# Altium PCB PCB1.PcbDoc
Units mm, origin at the board's own origin, x right, y up, seen from the top; angles counter-clockwise.
Board outline 120 x 80 mm, 2 copper layers (Top Layer, Bottom Layer); 110 components, 84 nets, 483 pads, 41 vias.
Unrouted connection lines stored in the file: 201.
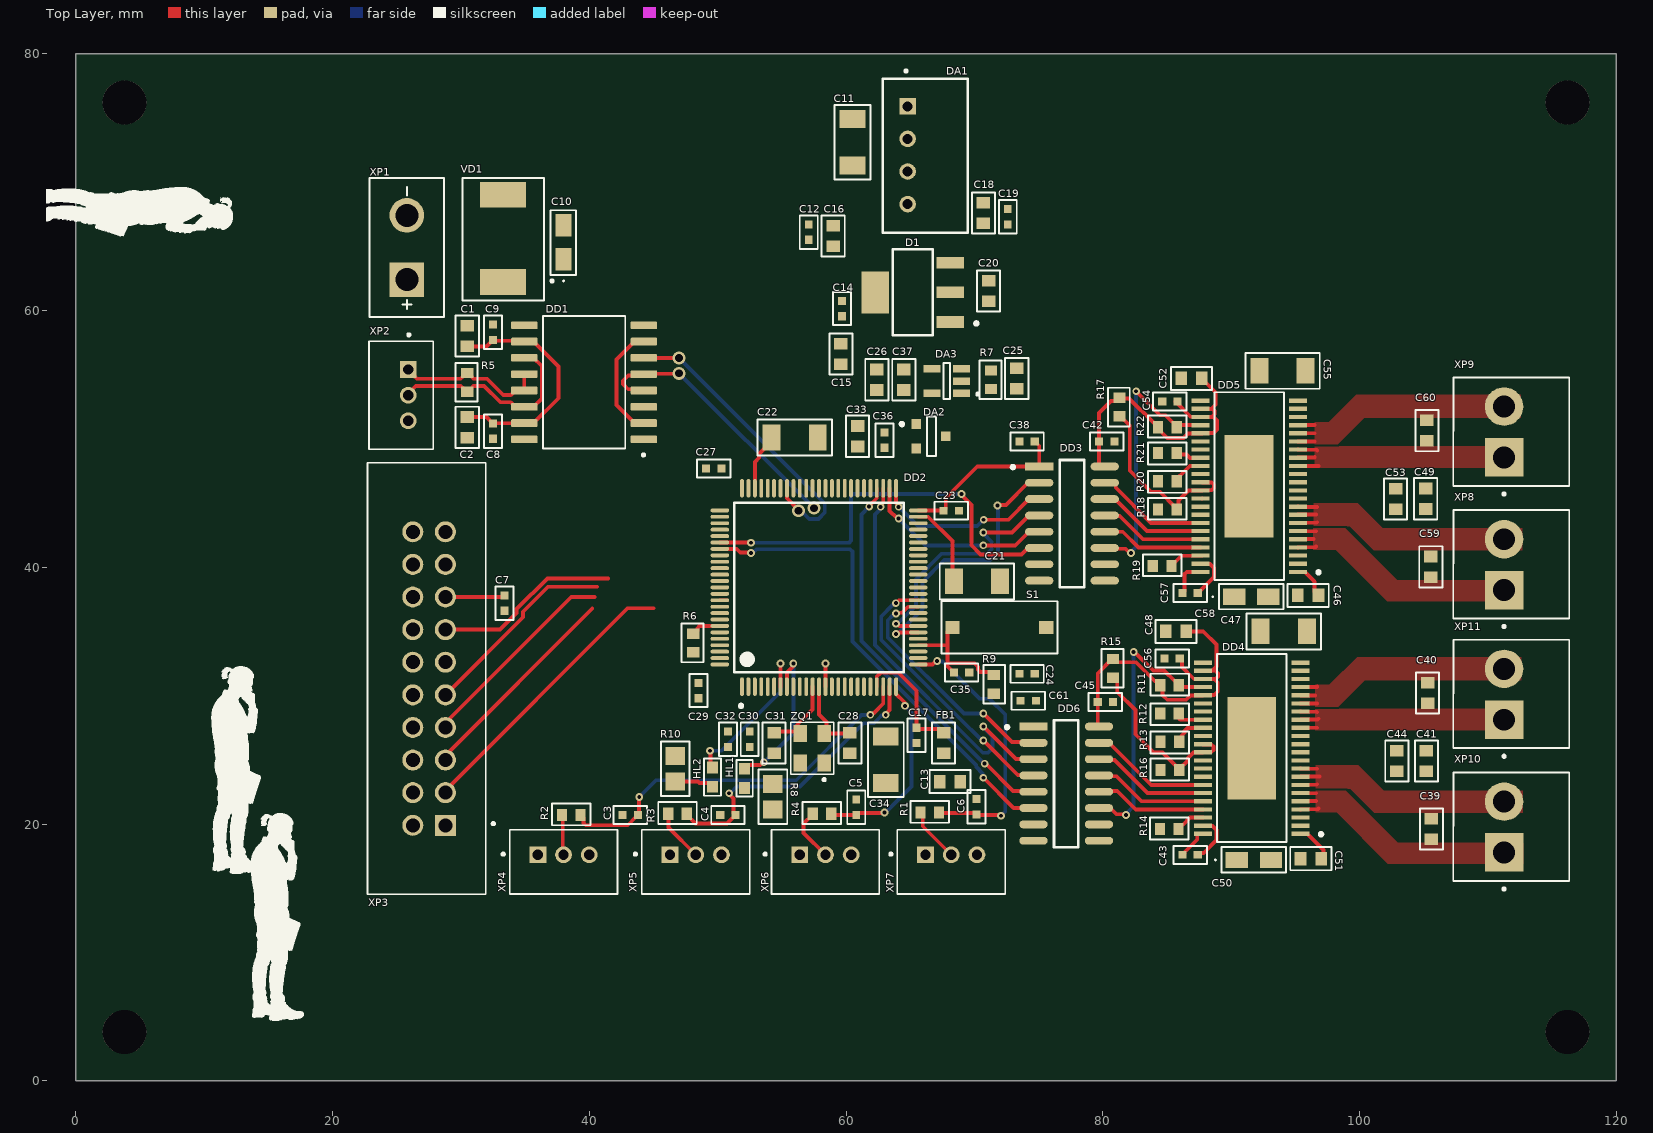
[diagram p0: Top Layer view]
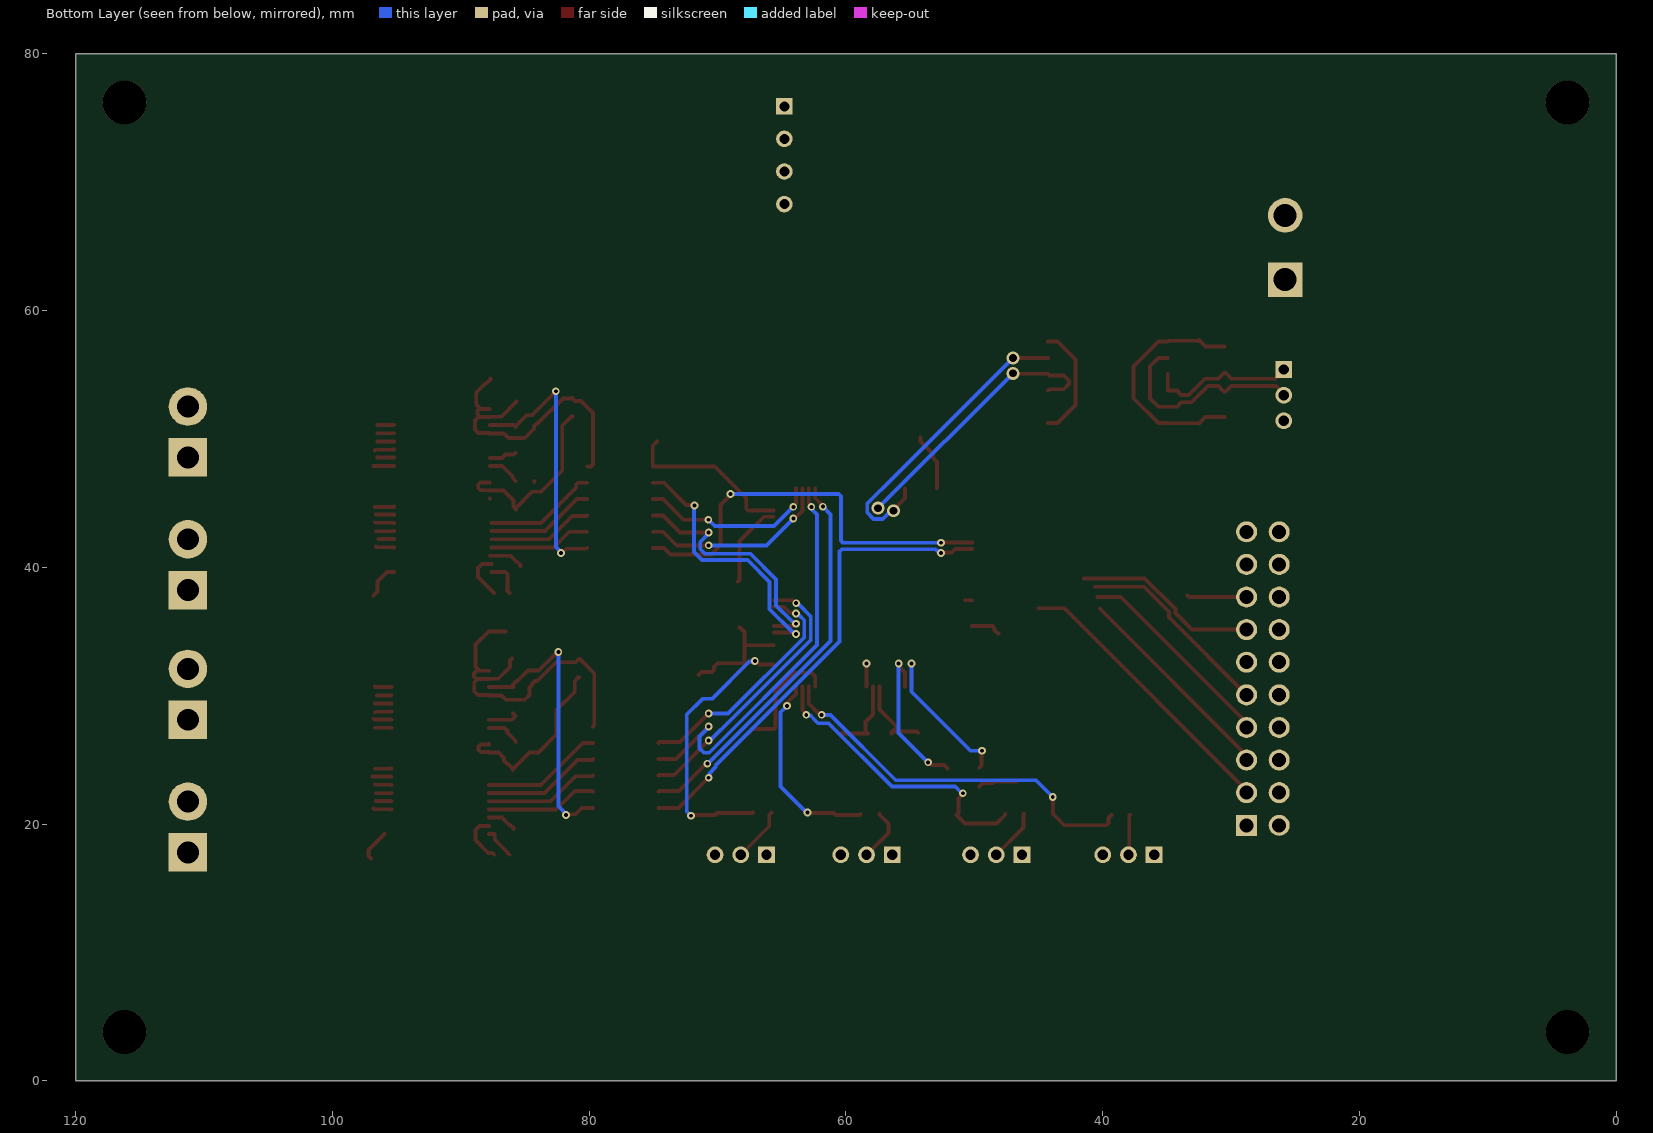
[diagram p1: Bottom Layer view, seen from below]
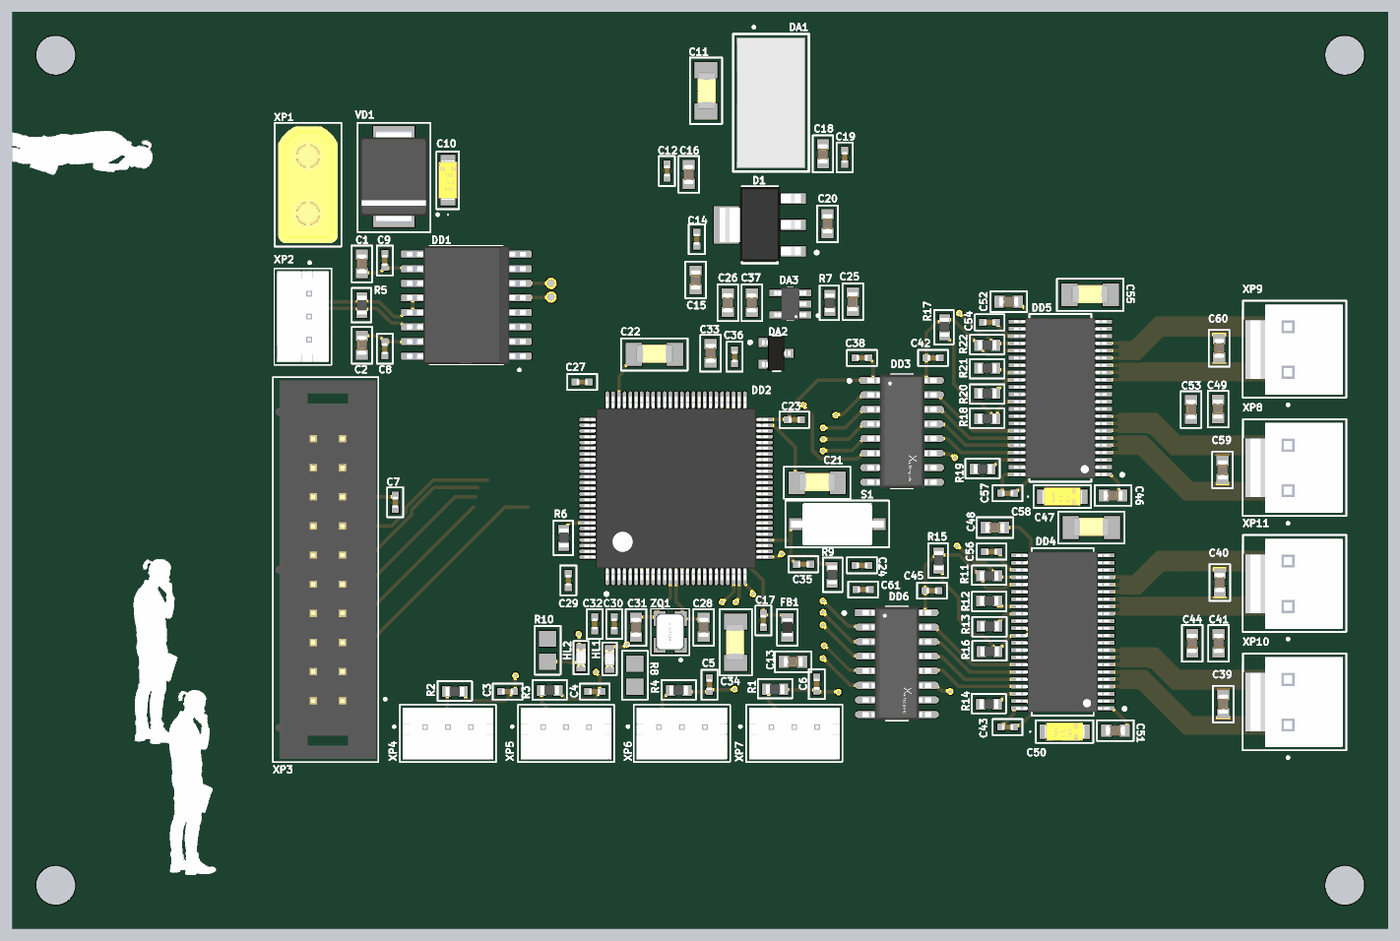
[diagram p2: 3D render of the assembled board from above, using the file's embedded part models]

## Layer stack, top to bottom
Top Solder: solder mask 0.0102, Solder Resist, Dk 3.5
Top Layer: signal copper 0.0356
Dielectric 1: dielectric 0.32, FR-4, Dk 4.8
Bottom Layer: signal copper 0.0356
Bottom Solder: solder mask 0.0102, Solder Resist, Dk 3.5

## Board outline
0,0 0,80 120,80 120,0

## Design rules (kind name [scope] priority, off if disabled: settings)
Clearance [All] p1: gap=0.2 ignorepadtopadclearanceinfootprint=FALSE
DiffPairsRouting [All] p1: maxlimit=0.254 minlimit=0.25 mostfreqgap=0.254 toplayer_minwidth=0.25 toplayer_maxwidth=0.4 toplayer_prefwidth=0.381 bottomlayer_minwidth=0.25 bottomlayer_maxwidth=0.4 bottomlayer_prefwidth=0.381 maxuncoupledlength=12.7
HoleSize [All] p1: absolutevalues=TRUE maxlimit=5 minlimit=0.5 maxpercent=80.000 minpercent=20.000
PolygonConnect PolygonConnect_1 [(InNet('M1_OUT_+') OR InNet('M1_OUT_-') OR InNet('M2_OUT_+') OR InNet('M2_OUT_-') OR InNet('M3_OUT_+') OR InNet('M3_OUT_-') OR InNet('M4_OUT_+') OR InNet('M4_OUT_-'))] p1: connectstyle=Direct reliefconductorwidth=0.254 reliefentries=4 polygonreliefangle="90 Angle" airgapwidth=0.254
PolygonConnect [All] p2: thpad.connectstyle=Relief thpad.reliefconductorwidth=0.254 thpad.reliefentries=4 thpad.polygonreliefangle="90 Angle" thpad.airgapwidth=0.254 smdpad.connectstyle=Relief smdpad.reliefconductorwidth=0.254 smdpad.reliefentries=4 smdpad.polygonreliefangle="90 Angle" smdpad.airgapwidth=0.254 via.connectstyle=Direct via.reliefconductorwidth=0.254 via.reliefentries=4 via.polygonreliefangle="90 Angle" via.airgapwidth=0.254
RoutingVias [All] p1: holewidth=0.6 width=1 viastyle="Through Hole" minholewidth=0.6 minwidth=1 maxholewidth=0.6 maxwidth=1
SolderMaskExpansion [All] p1: expansion=0.102 istentingtop=FALSE
SupplyNets "Schematic Supply Nets_9" [InNet('DVDD1')] p1: voltage=0.000
SupplyNets "Schematic Supply Nets_8" [InNet('GND_PWR')] p2: voltage=0.000
SupplyNets "Schematic Supply Nets_7" [InNet('VDDA')] p3: voltage=0.000
SupplyNets "Schematic Supply Nets_6" [InNet('+5В')] p4: voltage=0.000
SupplyNets "Schematic Supply Nets_5" [InNet('GND_MCU')] p5: voltage=0.000
SupplyNets "Schematic Supply Nets_4" [InNet('+24В')] p6: voltage=0.000
SupplyNets "Schematic Supply Nets_3" [InNet('VDD')] p7: voltage=0.000
SupplyNets "Schematic Supply Nets_2" [InNet('VREF+')] p8: voltage=0.000
SupplyNets "Schematic Supply Nets_1" [InNet('GND_ISO')] p9: voltage=0.000
SupplyNets "Schematic Supply Nets" [InNet('DVDD2')] p10: voltage=0.000
Width [All] p1: maxlimit=3 minlimit=0.2 preferedwidth=0.3
28 further rules are at their usual default settings.

## Classes and differential pairs
component class Sheet1: C1 C2 C3 C4 C5 C6 C7 C8 C9 C11 C12 C13 C14 C15 C16 C17 C18 C19 C20 C21 C22 C23 C24 C25 C26 C27 C28 C29 C30 C31 C32 C33 C34 C35 C36 C37 C58 D1 DA1 DA2 DA3 DD1 DD2 FB1 HL1 HL2 R1 R2 R3 R4 R5 R6 R7 R8 R9 R10 S1 VD1 XP1 XP2 XP3 XP4 XP5 XP6 XP7 ZQ1
component class Drivers: C10 C38 C39 C40 C41 C42 C43 C44 C45 C46 C47 C48 C49 C50 C51 C52 C53 C54 C55 C56 C57 C59 C60 C61 DD3 DD4 DD5 DD6 R11 R12 R13 R14 R15 R16 R17 R18 R19 R20 R21 R22 XP8 XP9 XP10 XP11
differential pair RS: +RS_P -RS_N

## Components (designator, comment, footprint, x,y, rotation, side; value= is the part's Value field where it differs from the comment)
C1 "Capacitor" 0603C 30.5,58 r270 top value="10 мк"
C2 "Capacitor" 0603C 30.5,50.9 r90 top value="10 н"
C3 "Capacitor" 0402C 43.2,20.7 r0 top value="0,1 мк"
C4 "Capacitor" 0402C 50.803,20.7 r0 top value="0,1 мк"
C5 "Capacitor" 0402C 60.8,21.3 r270 top value="0,1 мк"
C6 "Capacitor" 0402C 70.155,21.342 r270 top value="0,1 мк"
C7 "Capacitor" 0402C 33.4,37.203 r90 top value="0,1 мк"
C8 "Capacitor" 0402C 32.5,50.597 r90 top value="0,1 мк"
C9 "Capacitor" 0402C 32.5,58.3 r270 top value="0,1 мк"
C10 "Capacitor" TC_A 38,65.3 r90 top value="22 мк"
C11 "Capacitor" 1206C 60.5,73.1 r270 top value="4,7 мк"
C12 "Capacitor" 0402C 57.1,66.097 r90 top value="0,1 мк"
C13 "Capacitor" 0603C 68.1,23.3 r180 top value="1 мк"
C14 "Capacitor" 0402C 59.7,60.149 r90 top value="0,1 мк"
C15 "Capacitor" 0603C 59.6,56.6 r90 top value="10 н"
C16 "Capacitor" 0603C 59,65.8 r270 top value="10 мк"
C17 "Capacitor" 0402C 65.5,26.903 r90 top value="0,1 мк"
C18 "Capacitor" 0603C 70.7,67.6 r90 top value="10 мк"
C19 "Capacitor" 0402C 72.6,67.297 r90 top value="0,1 мк"
C20 "Capacitor" 0603C 71.1,61.5 r90 top value="10 мк"
C21 "Capacitor" 1206C 70.2,38.9 r0 top value="2,2 мк"
C22 "Capacitor" 1206C 56,50.1 r0 top value="2,2 мк"
C23 "Capacitor" 0402C 68.203,44.4 r180 top value="0,1 мк"
C24 "Capacitor" 0402C 74.1,31.7 r180 top value="0,1 мк"
C25 "Capacitor" 0603C 73.3,54.7 r270 top value="1 мк"
C26 "Capacitor" 0603C 62.4,54.6 r270 top value="0,47 мк"
C27 "Capacitor" 0402C 49.703,47.7 r0 top value="0,1 мк"
C28 "Capacitor" 0603C 60.3,26.303 r90 top value="12 п"
C29 "Capacitor" 0402C 48.5,30.397 r90 top value="0,1 мк"
C30 "Capacitor" 0402C 52.5,26.603 r90 top value="0,1 мк"
C31 "Capacitor" 0603C 54.4,26.303 r90 top value="12 п"
C32 "Capacitor" 0402C 50.8,26.603 r90 top value="0,1 мк"
C33 "Capacitor" 0603C 60.9,50.2 r270 top value="1 мк"
C34 "Capacitor" 1206C 63.1,25.003 r90 top value="4,7 мк"
C35 "Capacitor" 0402C 69.003,31.8 r180 top value="0,1 мк"
C36 "Capacitor" 0402C 63,49.9 r270 top value="0,1 мк"
C37 "Capacitor" 0603C 64.5,54.6 r270 top value="1 мк"
C38 "Capacitor" 0402C 74.1,49.8 r0 top value="0,1 мк"
C39 "Capacitor" 0603C 105.6,19.6 r270 top value="2,2 н"
C40 "Capacitor" 0603C 105.3,30.2 r90 top value="2,2 н"
C41 "Capacitor" 0603C 105.2,24.9 r270 top value="10 н"
C42 "Capacitor" 0402C 80.303,49.8 r180 top value="0,1 мк"
C43 "Capacitor" 0402C 86.8,17.6 r180 top value="0,1 мк"
C44 "Capacitor" 0603C 102.9,24.9 r270 top value="10 н"
C45 "Capacitor" 0402C 80.2,29.5 r180 top value="0,1 мк"
C46 "Capacitor" 0603C 96,37.8 r180 top value="1 мк"
C47 "Capacitor" 1206C 94.1,35 r0 top value="4,7 мк"
C48 "Capacitor" 0603C 85.7,35 r0 top value="1 мк"
C49 "Capacitor" 0603C 105.149,45.332 r270 top value="10 н"
C50 "Capacitor" TC_A 91.775,17.2 r0 top value="22 мк"
C51 "Capacitor" 0603C 96.2,17.3 r180 top value="1 мк"
C52 "Capacitor" 0603C 86.9,54.7 r0 top value="1 мк"
C53 "Capacitor" 0603C 102.8,45.3 r270 top value="10 н"
C54 "Capacitor" 0402C 85.225,52.9 r0 top value="0,1 мк"
C55 "Capacitor" 1206C 94,55.3 r0 top value="4,7 мк"
C56 "Capacitor" 0402C 85.4,32.9 r0 top value="0,1 мк"
C57 "Capacitor" 0402C 86.803,38 r180 top value="0,1 мк"
C58 "Capacitor" TC_A 91.575,37.7 r0 top value="22 мк"
C59 "Capacitor" 0603C 105.549,40.032 r270 top value="2,2 н"
C60 "Capacitor" 0603C 105.249,50.632 r90 top value="2,2 н"
C61 "Capacitor" 0402C 74.2,29.6 r0 top value="0,1 мк"
D1 "LD1117S33CTR" SOT223 65.2,61.4 r180 top
DA1 "TME 2405S" CONV_TME_2405S 66.675,72.05 r270 top
DA2 "REF3030AIDBZR" SOT23-3 66.6,50.2 r0 top
DA3 "ADP150AUJZ-3.3" SOT23-5 67.855,54.5 r180 top
DD1 "ADM2682EBRIZ" SOIC-16W 39.6,54.4 r180 top
DD2 "STM32F407VGT6" LQFP100 57.9,38.425 r90 top
DD3 "ISO7762DWR" SOIC-16 77.6,43.4 r0 top
DD4 "DRV8262DDWR" HTSSOP44-DDW_TEX 91.6,25.9 r180 top
DD5 "DRV8262DDWR" HTSSOP44-DDW_TEX 91.4,46.303 r180 top
DD6 "ISO7762DWR" SOIC-16 77.149,23.145 r0 top
FB1 "BLM18AG102SN1D" 0603L 67.6,26.3 r90 top
HL1 "LED 0603 RED" 0603D_red 52.1,23.55 r90 top value=Красный
HL2 "LED 0603 GREEN" 0603D_green 49.6,23.65 r90 top value=Зелёный
R1 "Resistor" 0603R 66.525,20.9 r0 top value="10 к"
R2 "Resistor" 0603R 38.6,20.7 r0 top value="10 к"
R3 "Resistor" 0603R 46.875,20.8 r0 top value="10 к"
R4 "Resistor" 0603R 58.125,20.8 r0 top value="10 к"
R5 "Resistor" 0603R 30.5,54.4 r90 top value=120
R6 "Resistor" 0603R 48.1,34.1 r90 top value="10 к"
R7 "Resistor" 0603R 71.3,54.6 r90 top value="10 к"
R8 "Resistor" 0805R 54.3,22.125 r90 top value="1 к"
R9 "Resistor" 0603R 71.5,30.875 r270 top value="10 к"
R10 "Resistor" 0805R 46.7,24.3 r270 top value="1 к"
R11 "Resistor" 0603R 85.2,30.8 r0 top value="10 к"
R12 "Resistor" 0603R 85.2,28.6 r180 top value="4,7 к"
R13 "Resistor" 0603R 85.225,26.4 r180 top value="3,6 к"
R14 "Resistor" 0603R 85.175,19.6 r0 top value="100 к"
R15 "Resistor" 0603R 80.8,32.125 r90 top value="10 к"
R16 "Resistor" 0603R 85.225,24.2 r0 top value="15 к"
R17 "Resistor" 0603R 81.3,52.475 r90 top value="10 к"
R18 "Resistor" 0603R 85.025,44.5 r0 top value="15 к"
R19 "Resistor" 0603R 84.625,40.1 r0 top value="100 к"
R20 "Resistor" 0603R 85.025,46.7 r180 top value="3,6 к"
R21 "Resistor" 0603R 85.025,48.9 r180 top value="3,6 к"
R22 "Resistor" 0603R 85.025,50.9 r0 top value="10 к"
S1 "TSS-TD-19XA-XTR" TSS-TD-19XA-XTR 71.95,35.3 r0 top
VD1 "SM15T33A" SMC 33.3,65.6 r90 top value="30 В"
XP1 "XT30UPB-M" XT30UPB-M 25.8,64.9 r90 top
XP2 "JST PH-3" JST_B3B-PH-K-S(LF)(SN) 25.35,53.4 r90 top
XP3 "ARM JTAG 20" 3M_30320-6002HB 27.53,31.33 r90 top
XP4 "JST PH-3" JST_B3B-PH-K-S(LF)(SN) 38,17.05 r180 top
XP5 "JST PH-3" JST_B3B-PH-K-S(LF)(SN) 48.3,17.05 r180 top
XP6 "JST PH-3" JST_B3B-PH-K-S(LF)(SN) 58.4,17.05 r180 top
XP7 "JST PH-3" JST_B3B-PH-K-S(LF)(SN) 68.2,17.05 r180 top
XP8 "JST VH-2" B2P-VH 111.251,40.2 r90 top
XP9 "JST VH-2" B2P-VH 111.251,50.532 r90 top
XP10 "JST VH-2" B2P-VH 111.251,19.768 r90 top
XP11 "JST VH-2" B2P-VH 111.251,30.1 r90 top
ZQ1 "XTAL_GND" QSMD3.2x2.5 58.3,24.753 r180 top value="8 МГц"

## Footprints (in the part's own frame and the unit in brackets; to place one, negate y for a bottom-side part, rotate by r counter-clockwise, add the part's x,y. Pads: shape width x height; smd on the part's side, far side on the other; paste and mask are expansions set on the pad)
3M_30320-6002HB [mil]
  rect 64.5x64.5 / inner round 64.5 / far side rect 64.5x64.5 hole 43: 1(-450,-50)
  round 64.5 hole 43: 2(-450,50) 3(-350,-50) 4(-350,50) 5(-250,-50) 6(-250,50) 7(-150,-50) 8(-150,50) 9(-50,-50) 10(-50,50) 11(50,-50) 12(50,50) 13(150,-50) 14(150,50) 15(250,-50) 16(250,50) 17(350,-50) 18(350,50) 19(450,-50) 20(450,50)
  silkscreen extent -661,-201 661,189, body extent -650,-165 650,180, height 360
0402C [mm]
  rect 0.635x0.61 smd: 1(-0.597,0) 2(0.597,0)
  silkscreen extent -1.3,-0.7 1.3,0.7, body extent -0.51,-0.25 0.51,0.25, height 0.71
0603C [mm] "Chip Resistor, 2-Leads, Body 1,40x0,80mm, IPC Medium Density"
  rect 0.9x1.05 smd: 1(-0.8,0) 2(0.8,0)
  silkscreen extent -1.6,-0.9 1.6,0.9, body extent -0.85,-0.45 0.85,0.45, height 0.9
0603D_green [mm]
  rect 0.91x0.83 smd: 1(0.75,0) 2(-0.75,0)
  silkscreen extent -1.45,-0.66 1.45,0.66, body extent -0.8,-0.41 0.8,0.41, height 0.71
0603D_red [mm]
  rect 0.91x0.83 smd: 1(0.75,0) 2(-0.75,0)
  silkscreen extent -1.42,-0.64 1.42,0.64, body extent -0.8,-0.41 0.8,0.41, height 0.71
0603L [mm] "Chip Inductor, 2-Leads, Body 1,55x0,85mm, IPC Medium Density"
  rect 0.9x1.05 smd: 1(-0.8,0) 2(0.8,0)
  silkscreen extent -1.6,-0.9 1.6,0.9, body extent -0.8,-0.45 0.8,0.45, height 0.45
0603R [mm] "Chip Resistor, 2-Leads, Body 1.60x0.85mm, IPC Medium Density"
  rect 0.8x0.95 smd: 1(-0.725,0) 2(0.725,0)
  silkscreen extent -1.5,-0.8 1.5,0.9, body extent -0.8,-0.4 0.8,0.4, height 0.45
0805R [mm]
  rect 1.4x1.5 smd: 1(-1,0) 2(1,0)
  silkscreen extent -2.12,-1.12 2.12,1.12, body extent -1,-0.63 1,0.63, height 0.6
1206C [mm]
  rect 1.4x2 smd paste+0: 1(-1.8,0) 2(1.8,0)
  silkscreen extent -2.9,-1.4 2.9,1.4, body extent -1.6,-0.74 1.6,0.86, height 1.59
B2P-VH [mm]
  rect 3x3 / inner round 3 / far side rect 3x3 hole 1.7 mask+0.102: 1(-1.98,0)
  round 3 hole 1.7 mask+0.102: 2(1.98,0)
  silkscreen extent -4.93,-5.08 4.25,3.96, body extent -3.93,-4.8 3.93,3.7, height 10.9
CONV_TME_2405S [mm]
  rect 1.288x1.288 hole 0.78: 1(-3.85,-1.875)
  round 1.288 hole 0.78: 2(-1.31,-1.875) 3(1.23,-1.875) 4(3.77,-1.875)
  silkscreen extent -6.7,-3.8 6,2.8, body extent -5.7,-3.5 5.7,2.5, height 9.91
HTSSOP44-DDW_TEX [mil]
  rect 55.28x12.97 smd: 1(-149.64,262.5) 2(-149.64,237.5) 3(-149.64,212.5) 4(-149.64,187.5) 5(-149.64,162.5) 6(-149.64,137.5) 7(-149.64,112.5) 8(-149.64,87.5) 9(-149.64,62.5) 10(-149.64,37.5) 11(-149.64,12.5) 12(-149.64,-12.5) 13(-149.64,-37.5) 14(-149.64,-62.5) 15(-149.64,-87.5) 16(-149.64,-112.5) 17(-149.64,-137.5) 18(-149.64,-162.5) 19(-149.64,-187.5) 20(-149.64,-212.5) 21(-149.64,-237.5) 22(-149.64,-262.5) 23(149.64,-262.5) 24(149.64,-237.5) 25(149.64,-212.5) 26(149.64,-187.5) 27(149.64,-162.5) 28(149.64,-137.5) 29(149.64,-112.5) 30(149.64,-87.5) 31(149.64,-62.5) 32(149.64,-37.5) 33(149.64,-12.5) 34(149.64,12.5) 35(149.64,37.5) 36(149.64,62.5) 37(149.64,87.5) 38(149.64,112.5) 39(149.64,137.5) 40(149.64,162.5) 41(149.64,187.5) 42(149.64,212.5) 43(149.64,237.5) 44(149.64,262.5)
  rect 150x315 smd paste-196.85: 45(0,0)
  silkscreen extent -218,-288 106,287, body extent -159,-276 159,276, height 47
JST_B3B-PH-K-S(LF)(SN) [mm]
  rect 1.308x1.308 / inner round 1.308 / far side rect 1.308x1.308 hole 0.8: 1(2,-0.55)
  round 1.308 hole 0.8: 2(0,-0.55) 3(-2,-0.55)
  silkscreen extent -4.2,-2.5 4.8,2.5, body extent -3.95,-2.25 3.95,2.25, height 6
LQFP100 [mm] "TSQFP, 100-Leads, Body 14,00x14,00mm, Pitch 0,50mm, IPC Medium Density"
  oval 1.45x0.3 smd: 1(-7.725,6) 2(-7.725,5.5) 3(-7.725,5) 4(-7.725,4.5) 5(-7.725,4) 6(-7.725,3.5) 7(-7.725,3) 8(-7.725,2.5) 9(-7.725,2) 10(-7.725,1.5) 11(-7.725,1) 12(-7.725,0.5) 13(-7.725,0) 14(-7.725,-0.5) 15(-7.725,-1) 16(-7.725,-1.5) 17(-7.725,-2) 18(-7.725,-2.5) 19(-7.725,-3) 20(-7.725,-3.5) 21(-7.725,-4) 22(-7.725,-4.5) 23(-7.725,-5) 24(-7.725,-5.5) 25(-7.725,-6) 51(7.725,-6) 52(7.725,-5.5) 53(7.725,-5) 54(7.725,-4.5) 55(7.725,-4) 56(7.725,-3.5) 57(7.725,-3) 58(7.725,-2.5) 59(7.725,-2) 60(7.725,-1.5) 61(7.725,-1) 62(7.725,-0.5) 63(7.725,0) 64(7.725,0.5) 65(7.725,1) 66(7.725,1.5) 67(7.725,2) 68(7.725,2.5) 69(7.725,3) 70(7.725,3.5) 71(7.725,4) 72(7.725,4.5) 73(7.725,5) 74(7.725,5.5) 75(7.725,6)
  oval 0.3x1.45 smd: 26(-6,-7.725) 27(-5.5,-7.725) 28(-5,-7.725) 29(-4.5,-7.725) 30(-4,-7.725) 31(-3.5,-7.725) 32(-3,-7.725) 33(-2.5,-7.725) 34(-2,-7.725) 35(-1.5,-7.725) 36(-1,-7.725) 37(-0.5,-7.725) 38(0,-7.725) 39(0.5,-7.725) 40(1,-7.725) 41(1.5,-7.725) 42(2,-7.725) 43(2.5,-7.725) 44(3,-7.725) 45(3.5,-7.725) 46(4,-7.725) 47(4.5,-7.725) 48(5,-7.725) 49(5.5,-7.725) 50(6,-7.725) 76(6,7.725) 77(5.5,7.725) 78(5,7.725) 79(4.5,7.725) 80(4,7.725) 81(3.5,7.725) 82(3,7.725) 83(2.5,7.725) 84(2,7.725) 85(1.5,7.725) 86(1,7.725) 87(0.5,7.725) 88(0,7.725) 89(-0.5,7.725) 90(-1,7.725) 91(-1.5,7.725) 92(-2,7.725) 93(-2.5,7.725) 94(-3,7.725) 95(-3.5,7.725) 96(-4,7.725) 97(-4.5,7.725) 98(-5,7.725) 99(-5.5,7.725) 100(-6,7.725)
  silkscreen extent -9.35,-6.6 6.6,6.6, body extent -8,-8 8,8, height 1.6
QSMD3.2x2.5 [mm] "Кварцевый резонатор"
  rect 1.05x1.3 smd: 1(0,0) 2(1.85,-2.3) 3(0,-2.3) 3(1.85,0)
  silkscreen extent -0.76,-3.17 2.6,1.4, body extent -0.32,-2.75 2.18,0.45, height 0.8
SMC [mm]
  rect 2x3.6 smd: 1(3.415,0.021) 2(-3.385,0.021)
  silkscreen extent -4.83,-3.91 4.7,3.18, body extent -3.96,-2.93 3.99,2.97, height 2.65
SOIC-16 [mm] "SOT109-1"
  rect 2.204x0.608 smd: 1(-2.551,4.445)
  rrect100% 2.204x0.608 smd: 2(-2.551,3.175) 3(-2.551,1.905) 4(-2.551,0.635) 5(-2.551,-0.635) 6(-2.551,-1.905) 7(-2.551,-3.175) 8(-2.551,-4.445) 9(2.551,-4.445) 10(2.551,-3.175) 11(2.551,-1.905) 12(2.551,-0.635) 13(2.551,0.635) 14(2.551,1.905) 15(2.551,3.175) 16(2.551,4.445)
  silkscreen extent -4.72,-4.95 0.95,4.95, body extent -4.15,-5.45 4.15,5.45, height 0.25
SOIC-16W [mm]
  rrect25% 2.05x0.6 smd: 1(-4.655,4.445) 2(-4.655,3.175) 3(-4.655,1.905) 4(-4.655,0.635) 5(-4.655,-0.635) 6(-4.655,-1.905) 7(-4.655,-3.175) 8(-4.655,-4.445) 9(4.655,-4.445) 10(4.655,-3.175) 11(4.655,-1.905) 12(4.655,-0.635) 13(4.655,0.635) 14(4.655,1.905) 15(4.655,3.175) 16(4.655,4.445)
  silkscreen extent -4.72,-5.15 3.2,5.75, body extent -5.16,-5.15 5.16,5.15, height 2.65
SOT23-3 [mil]
  rect 30x30 smd: 1(-44.29,37.4) 2(-44.29,-37.6) 3(45.71,-0.1)
  silkscreen extent -93,-61 16,61, body extent -48,-60 50,59, height 41
SOT23-5 [mm]
  rect 1.32x0.59 smd: 1(-1.145,0.95) 2(-1.145,0) 3(-1.145,-0.95) 4(1.145,-0.95) 5(1.145,0.95)
  silkscreen extent -2.51,-1.4 0.25,1.4, body extent -1.4,-1.45 1.4,1.45, height 1.45
SOT223 [mm] "SOT223, ld1117"
  rect 2.15x0.9 smd: 1(-2.925,2.3) 2(-2.925,0) 3(-2.925,-2.3)
  rect 2.15x3.25 smd: 2(2.925,0)
  silkscreen extent -5.08,-3.35 1.55,3.35, body extent -3.56,-3.3 3.51,3.2, height 1.6
TC_A [mm] "Tantalum capacitor, type A,  1 pin - plus"
  rect 1.75x1.25 smd: 1(-1.325,0) 2(1.325,0)
  silkscreen extent -3.05,-0.97 2.5,1, body extent -1.73,-0.8 1.73,0.8, height 1.64
TSS-TD-19XA-XTR [mm]
  rect 1.1x1 smd: 1(-3.65,0) 2(3.65,0)
  silkscreen extent -4.52,-2.02 4.53,2.05, body extent -4.05,-1.85 4.05,1.85, height 2.55
XT30UPB-M [mm]
  rect 2.7x2.7 hole 1.8: 1(-2.5,0)
  round 2.7 hole 1.8: 2(2.5,0)
  silkscreen extent -5.4,-2.9 5.4,2.9, body extent -5.1,-2.6 5.1,2.6, height 10.7

## Part data
C1 C16 C18 C20: library part Capacitor_10u_10_10V_X7R_0603C, "Конденсатор 0603C ёмкостью 10 мк 10%, 10 В, X7R", Capacity (nF)=10000, Dielectric=X7R, Tolerance=10%, Voltage (V)=10, Datasheet=https://static.chipdip.ru/lib/893/DOC031893419.pdf, Part Number=Capacitor_10u_10_10V_X7R_0603C, Автор=glebmih
C2 C15 C41 C44 C49 C53: library part Capacitor_10n_10_50V_X7R_0603C, "Конденсатор 0603C ёмкостью 10 н 10%, 50 В, X7R", Capacity (nF)=10, Dielectric=X7R, Tolerance=10%, Voltage (V)=50, Part Number=Capacitor_10n_10_50V_X7R_0603C
C3 C4 C5 C6 C7 C8 C9 C12 C14 C17 C19 C23 C24 C27 C29 C30 C32 C35 C36 C38 C42 C43 C45 C54 C56 C57 C61: library part Capacitor_0,1u_10_16V_X7R_0603C, "Конденсатор 0402C ёмкостью 0,1 мк 10%, 16 В, X7R", Capacity (nF)=100, Dielectric=X7R, Tolerance=10%, Voltage (V)=16, Part Number=Capacitor_0,1u_10_16V_X7R_0603C, Автор=rreali
C10 C50 C58: library part Capacitor_22u_10_50V_TC_A, "Танталовый конденсатор", Capacity (uF)=22, Tolerance=0,1, Voltage (V)=50, Part Number=Capacitor_22u_10_50V_TC_A, Type=Tantalum
C11 C34 C47 C55: library part Capacitor_4,7u_10_50V_X7R_1206C, "Конденсатор 1206C ёмкостью 4,7 мк 10%, 50 В, X7R", Capacity (nF)=4700, Dielectric=X7R, Tolerance=10%, Voltage (V)=50, Part Number=Capacitor_4,7u_10_50V_X7R_1206C
C13 C25 C33 C37 C46 C48 C51 C52: library part Capacitor_1u_10_25V_X7R_0603C, "Конденсатор 0603C ёмкостью 1 мк 10%, 25 В, X7R", Capacity (nF)=1000, Dielectric=X7R, Tolerance=10%, Voltage (V)=25, Part Number=Capacitor_1u_10_25V_X7R_0603C
C21 C22: library part Capacitor_2,2u_10_50V_X7R_1206C, "Конденсатор 1206C ёмкостью 2,2 мк 10%, 50 В, X7R", Capacity (nF)=2200, Dielectric=X7R, Tolerance=10%, Voltage (V)=50, Part Number=Capacitor_2,2u_10_50V_X7R_1206C
C26: library part Capacitor_0,47u_10_50V_X7R_0603C, "Конденсатор 0603C ёмкостью 0,47 мк 10%, 50 В, X7R", Capacity (nF)=470, Dielectric=X7R, Tolerance=10%, Voltage (V)=50, Part Number=Capacitor_0,47u_10_50V_X7R_0603C
C28 C31: library part Capacitor_12p_5_50V_NP0_0603C, "Конденсатор 0603C ёмкостью 12 п 5%, 50 В, NP0", Capacity (nF)=0,012, Dielectric=NP0, Tolerance=5%, Voltage (V)=50, Part Number=Capacitor_12p_5_50V_NP0_0603C, Автор=glebmih
C39 C40 C59 C60: library part Capacitor_2,2n_10_50V_X7R_0603C, "Конденсатор 0603C ёмкостью 2,2 н 10%, 50 В, X7R", Capacity (nF)=2,2, Dielectric=X7R, Tolerance=10%, Voltage (V)=50, Part Number=Capacitor_2,2n_10_50V_X7R_0603C
D1: "Линейный стабилизатор напряжения", Part Number=LD1117S33CTR
DA1: "DC/DC преобразователь, 1Вт, вход 21.6-26.4В, выход 5В/ 200мА", Part Number="TME 2405S"
DA2: "Источник опорного напряжения, 3В", Datasheet=https://static.chipdip.ru/lib/248/DOC000248445.pdf, Part Number=REF3030AIDBZR, Автор=glebmih
DA3: "Стабилизатор напряжения 3.3В 150мА", Datasheet=https://static.chipdip.ru/lib/986/DOC003986581.pdf, Part Number=ADP150AUJZ-3.3, Автор=glebmih
DD1: "Изолированный RS-485 приемопередатчик, с встроенным DC-DC преобразователем", Part Number=ADM2682EBRIZ
DD2: "Микроконтроллер", Part Number=STM32F407VGT6
DD3 DD6: "Шестиканальный цифровой изолятор", Part Number=ISO7762DWR
DD4 DD5: "Спаренный драйвер управления ДПТ", Part Number=DRV8262DDWR
FB1: "Дроссель подавления ЭМП", Datasheet=https://www.chipdip.ru/product/blm18ag102sn1d-1-kom-0.4a-0603-drossel-podavleniya-murata-9000029220, Part Number=BLM18AG102SN1D, Автор=glebmih
HL1: "Светодиод 0603 Красный", Part Number="LED 0603 RED", Автор=rreali
HL2: "Светодиод 0603 Зелёный", Part Number="LED 0603 GREEN", Автор=rreali
R1 R2 R3 R4 R6 R7 R9 R11 R15 R17 R22: library part Resistor_10k_1_0603, "Резистор номиналом 10 кОм 1%", Tolerance=1%, Part Number=Resistor_10k_1_0603
R5: library part Resistor_120_1_0603, "Резистор номиналом 120 Ом 1%", Tolerance=1%, Part Number=Resistor_120_1_0603
R8 R10: library part Resistor_1k_0805, "Резистор номиналом 1 кОм 1%", Tolerance=1%, Part Number=Resistor_1k_0805, Автор=glebmih
R12: library part Resistor_4.7k_1_0603, "Резистор номиналом 4,7 кОм 1%", Tolerance=1%, Part Number=Resistor_4.7k_1_0603
R13 R20 R21: library part Resistor_3.6k_1_0603, "Резистор номиналом 3,6 кОм 1%", Tolerance=1%, Part Number=Resistor_3.6k_1_0603
R14 R19: library part Resistor_100k_1_0603, "Резистор номиналом 100 кОм 1%", Tolerance=1%, Part Number=Resistor_100k_1_0603
R16 R18: library part Resistor_15k_1_0603, "Резистор номиналом 15 кОм 1%", Tolerance=1%, Part Number=Resistor_15k_1_0603
S1: "Тактовая кнопка", Datasheet=https://cdn.promelec.ru/upload/items/2023/04/17/TSS-TD-19XA.pdf, Part Number=TSS-TD-19XA-XTR, Автор=glebmih
VD1: "Защитный диод на 30 В, рассеиваемая мощность 1500 Вт", Power (W)=1500, Voltage (V)=30, Part Number=SM15T33A
XP1: "Вилка прямая силовая 2-контактная на плату, 15А, 500В", Datasheet=https://www.tme.eu/en/details/xt30upb-m/dc-power-connectors/amass/, Part Number=XT30UPB-M, Автор=Гидролиба
XP2 XP4 XP5 XP6 XP7: "Вилка штыревая 3-контактная на плату прямая с ключом, шаг 2,0 мм", Datasheet=https://ihmevekotin.fi/liittimet/314-jst-ph-3-pinninen-liitaentaejohto.html, Part Number="JST PH-3", Автор=Макс
XP3: "Вилка штыревая двухрядная 20-контактная, шаг 2,54", Datasheet=https://support.arm.com/documentation/dui0499/a/Target-Interface-Connections/ARM-JTAG-20, Part Number="ARM JTAG 20", Автор=Макс
XP8 XP9 XP10 XP11: "Вилка силовая 2-контактная на плату прямая, шаг 3,96 мм", Datasheet=https://www.tme.eu/en/details/b2p-vh/raster-signal-connectors-3-96mm/jst/b2p-vh-lf-sn/, Part Number="JST VH-2", Автор=Макс
ZQ1: "Кварцевый резонатор с входом земли", Part Number=XTAL_GND

## Free pads (board coordinates)
  round 3.4 hole 3.4 unplated: 3(3.8,3.8) 3(3.8,76.2) 3(116.2,3.8) 3(116.2,76.2)

## Via types
v1: diameter 0.6, hole 0.3, Top Layer to Bottom Layer, 37 vias
v2: diameter 1, hole 0.6, Top Layer to Bottom Layer, 4 vias

## Nets (pads, with @x,y where several pads share a name; then routed paths per layer and width w, separated by ;. In a path a pad name is that pad's centre, name@x,y a point inside that pad or via, vN(x,y) a via of type N, cw(c..) or ccw(c..) an arc to the next point about the centre after c; other vN are vias at no path point)
+5В: C18.2 C19.2 C25.2 D1.3 DA1.4 DA3.1 R7.1
+24В: C10.1 C11.2 C41.2 C44.2 C46.2 C47.2 C49.2 C50.1 C51.2 C53.2 C55.2 C58.1 DA1.2 DD4.2 DD4.11 DD4.12 DD4.21 DD5.2 DD5.11 DD5.12 DD5.21 R14.1 R19.1 VD1.2 XP1.1
ADC_POT1: C3.2 DD2.23 R2.2 | length 30.2
  Top Layer w0.3: R2.2 39.55,20.475 39.55,20.076 39.726,19.9 42.997,19.9 43.629,20.532 43.629,20.545 43.861,20.776 43.873,20.776 43.873,22.073 v1(43.9,22.1) ; v1(61.9,28.5) 61.981,28.5 62.131,28.65 62.169,28.65 62.9,29.381 DD2.23
  Bottom Layer w0.3: v1(43.9,22.1) 45.211,23.411 56.13,23.411 61.219,28.5 v1(61.9,28.5)
ADC_POT2: C4.2 DD2.24 R3.2 | length 23.4
  Top Layer w0.3: R3.2 47.6,20.725 48.28,20.045 50.733,20.045 51.388,20.7 51.233,20.855 51.233,21.986 50.9,22.319 v1(50.9,22.4) ; v1(63.1,28.5) 63.1,28.581 63.4,28.881 DD2.24
  Bottom Layer w0.3: v1(50.9,22.4) 50.981,22.4 51.492,22.911 56.411,22.911 61.35,27.85 62.169,27.85 62.55,28.231 62.55,28.238 62.755,28.443 63.001,28.443 v1@63.079,28.521
ADC_POT3: C5.2 DD2.25 R4.2 | length 15.5
  Top Layer w0.3: R4.2 58.947,20.703 C5.2 60.948,20.852 62.952,20.852 v1(63,20.9) ; DD2.25 63.9,30.125 64.543,29.482 64.543,29.257 v1(64.6,29.2)
  Bottom Layer w0.3: v1(63,20.9) 63.081,20.9 65.1,22.919 65.1,28.7 v1(64.6,29.2)
ADC_POT4: C6.2 DD2.26 R1.2 | length 21.7
  Top Layer w0.3: DD2.26 66.744,32.425 67.019,32.7 v1(67.1,32.7) ; R1.2 67.305,20.845 67.525,20.845 C6.2@70.055,20.845 ; C6.2 C6.2@70.055,20.845 ; v1(72.064,20.642) 72.007,20.7 70.2,20.7 C6.2@70.055,20.845
  Bottom Layer w0.3: v1(67.1,32.7) 67.13,32.67 67.53,32.67 70.45,29.75 71.176,29.75 72.4,28.526 72.4,20.978 v1(72.064,20.642)
BUTTON: C35.2 DD2.29 R9.1 S1.1 | length 10.3
  Top Layer w0.3: DD2.29 67.906,33.925 ; S1.1 68.256,35.3 67.906,34.95 67.906,33.925 ; C35.2 68.394,31.8 67.906,32.288 67.906,32.517 ; R9.1 71.25,31.85 70.443,31.85 70.267,32.026 70.267,32.25 70.001,32.517 67.906,32.517 ; 67.906,32.517 67.906,33.925
DRV1_DIR1: DD3.13 DD5.40 | length 8.2
  Top Layer w0.3: DD3.13 80.21,43.976 81.324,43.976 83.125,42.175 DD5.40
DRV1_DIR2: DD3.15 DD5.38 | length 8.9
  Top Layer w0.3: DD3.15 80.866,46.575 81.008,46.433 81.008,46.198 83.761,43.445 DD5.38
DRV1_PWM1: DD3.12 DD5.41 | length 8
  Top Layer w0.3: DD3.12 81.554,42.765 82.779,41.54 DD5.41
DRV1_PWM2: DD3.14 DD5.39 | length 8.5
  Top Layer w0.3: DD3.14 80.949,45.305 83.444,42.81 DD5.39
DRV2_DIR3: DD4.40 DD6.13 | length 8.9
  Top Layer w0.3: DD6.13 79.759,23.721 81.079,23.721 83.027,21.773 DD4.40
DRV2_DIR4: DD4.38 DD6.15 | length 9.5
  Top Layer w0.3: DD6.15 80.498,26.32 83.776,23.043 DD4.38
DRV2_PWM3: DD4.41 DD6.12 | length 8.7
  Top Layer w0.3: DD6.12 79.759,22.569 81.131,22.569 82.562,21.138 DD4.41
DRV2_PWM4: DD4.39 DD6.14 | length 9.2
  Top Layer w0.3: DD6.14 79.757,24.993 80.907,24.993 83.492,22.408 DD4.39
DVDD1: C42.2 C52.2 C54.2 DD3.16 DD5.24 DD5.25 DD5.27 R17.2 R22.1 | length 25
  Top Layer w0.3: C42.2 79.706,52.006 80.65,52.95 81.125,52.95 R17.2@81.375,53.2 ; C42.2@79.719,49.8 79.719,47.987 79.861,47.845 DD3.16 ; R17.2 81.349,53.151 82.049,53.151 83.975,51.225 84.05,51.225 84.3,50.975 R22.1 84.275,50.875 84.275,50.825 85.025,50.075 86.295,50.075 86.635,50.415 87.733,50.415 DD5.27@87.748,50.43 ; C54.2@85.658,52.9 86.843,51.715 87.733,51.715 87.748,51.7 88.5,51.7 88.711,51.911 88.711,52.159 88.535,52.335 DD5.24@87.748,52.335 ; DD5.27 DD5.27@87.748,50.43 ; C52.2 87.7,54.625 88,54.325 88.075,54.325 88.8,53.6 88.8,52.66 88.49,52.35 ; 88.708,51.608 88.9,51.416 88.9,50.714 88.631,50.445 87.763,50.445 DD5.27@87.748,50.43
DVDD2: C45.2 C48.2 C56.2 DD4.24 DD4.25 DD4.27 DD6.16 R11.1 R15.2 | length 27.5
  Top Layer w0.3: DD6.16 79.603,27.687 C45.2 79.603,31.728 80.725,32.85 R15.2 81.05,32.6 82.574,32.6 84.049,31.125 84.225,31.125 84.45,30.9 84.45,30.825 84.643,30.632 84.643,30.057 85.025,29.675 86.495,29.675 86.833,30.013 87.784,30.013 87.814,30.042 88.682,30.042 88.951,30.311 88.951,31.014 88.682,31.283 ; C56.2 86.009,32.9 86.164,32.745 86.164,32.236 87.088,31.312 87.784,31.312 DD4.25 88.798,31.298 88.976,31.476 88.976,31.724 88.767,31.933 DD4.24 ; C48.2 87.824,35 88.851,33.973 88.851,32.258 88.541,31.947
FAULT_DRV_1: DD3.11 DD5.26 R22.2 | length 21.4
  Top Layer w0.3: DD3.11 80.21,41.436 81.783,41.436 82.119,41.1 v1(82.2,41.1) ; v1(82.6,53.7) 84.462,51.838 84.887,51.838 85.725,51 85.725,50.9 85.89,51.065 DD5.26@87.748,51.065
  Bottom Layer w0.3: v1(82.2,41.1) 82.2,41.181 82.6,41.581 v1(82.6,53.7)
FAULT_DRV_2: DD4.26 DD6.11 R11.2 | length 21.8
  Top Layer w0.3: DD6.11 80.582,21.24 81.064,20.757 81.743,20.757 v1(81.8,20.7) ; v1(82.4,33.4) 82.481,33.4 83.935,31.947 84.778,31.947 85.6,31.125 85.675,31.125 85.925,30.875 R11.2 ; R11.2@85.902,30.677 87.784,30.677 DD4.26
  Bottom Layer w0.3: v1(81.8,20.7) 81.8,20.781 82.4,21.381 v1(82.4,33.4)
GND_ISO: C1.1 C2.1 C8.1 C9.1 DD1.9 DD1.16 XP2.3
GND_MCU: C3.1 C4.1 C5.1 C6.1 C7.1 C12.2 C13.1 C14.2 C15.1 C16.1 C17.1 C18.1 C19.1 C20.1 C21.2 C22.2 C23.1 C24.1 C25.1 C26.1 C27.1 C28.1 C29.1 C30.1 C31.1 C32.1 C33.1 C34.1 C35.1 C36.1 C37.1 C38.1 C61.1 D1.1 DA1.3 DA2.3 DA3.2 DD1.1 DD1.8 DD2.10 DD2.20 DD2.27 DD2.74 DD2.99 DD3.8 DD6.8 R6.1 R8.1 R10.1 S1.2 XP3.4 XP3.6 XP3.8 XP3.10 XP3.12 XP3.14 XP3.16 XP3.17 XP3.18 XP3.19 XP3.20 XP4.3 XP5.3 XP6.3 XP7.3 ZQ1.3
GND_PWR: C10.2 C11.1 C41.1 C42.1 C44.1 C45.1 C47.1 C48.1 C49.1 C50.2 C52.1 C53.1 C54.1 C55.1 C56.1 C58.2 DA1.1 DD3.9 DD3.10 DD4.3 DD4.10 DD4.13 DD4.20 DD4.22 DD4.23 DD4.28 DD4.29 DD4.35 DD4.37 DD4.45 DD5.3 DD5.10 DD5.13 DD5.20 DD5.22 DD5.23 DD5.28 DD5.29 DD5.35 DD5.37 DD5.45 DD6.9 DD6.10 R12.2 R13.2 R16.1 R18.1 R20.2 R21.2 VD1.1 XP1.2 | length 0.1
  Top Layer w0.3: R20.2@84.275,46.65 R20.2@84.275,46.725 ; DD5.35@87.733,45.335 DD5.35@87.748,45.35
JTAG_TCK: DD2.76 XP3.9 | length 15.6
  Top Layer w0.3: XP3.9 34.847,36.107 34.847,36.527 36.801,38.481 40.619,38.481
JTAG_TDI: DD2.77 XP3.5 | length 16.5
  Top Layer w0.3: XP3.5 28.8,25.342 40.239,36.781
JTAG_TDO: DD2.89 XP3.13 | length 14.5
  Top Layer w0.3: XP3.13 33.051,35.14 34.347,36.436 34.347,36.734 36.744,39.131 41.45,39.131
JTAG_TMS: DD2.72 XP3.7 | length 16
  Top Layer w0.3: XP3.7 28.8,27.882 38.599,37.681 40.426,37.681
JTAG_TRST: DD2.90 XP3.3 | length 22.8
  Top Layer w0.3: XP3.3 28.8,22.619 42.981,36.8 45,36.8 ; DD2.90 DD2.90@50.75,37.425
LED_ERROR: DD2.8 HL1.1 | length 12.4
  Top Layer w0.3: HL1.1 52.1,24.34 52.365,24.605 53.324,24.605 53.519,24.8 v1(53.6,24.8) ; DD2.8 55.4,31.811 55.9,32.311 v1(55.9,32.5)
  Bottom Layer w0.3: v1(53.6,24.8) 55.9,27.1 v1(55.9,32.5)
LED_OK: DD2.7 HL2.1 | length 12.8
  Top Layer w0.3: v1(49.4,25.7) 49.457,25.643 49.457,24.543 HL2.1 ; DD2.7 v1(54.9,32.5)
  Bottom Layer w0.3: v1(49.4,25.7) 49.45,25.65 49.6,25.65 49.657,25.707 50.307,25.707 54.9,30.3 v1(54.9,32.5)
M1_OUT_+: C59.2 DD5.4 DD5.5 DD5.6 XP8.1 | length 4
  Top Layer w0.3: DD5.4 95.216,41.555 96.555,41.555 96.6,41.6 ; DD5.5 95.216,42.19 96.394,42.19 96.4,42.195 ; DD5.6 95.211,42.8 96.6,42.8
M1_OUT_-: C59.1 DD5.7 DD5.8 DD5.9 XP8.2 | length 4.4
  Top Layer w0.3: DD5.7 95.216,43.46 96.66,43.46 96.7,43.5 ; DD5.8 95.216,44.095 96.595,44.095 96.6,44.1 ; DD5.9 95.216,44.7 96.7,44.7
M2_OUT_+: C60.1 DD5.14 DD5.15 DD5.16 XP9.1 | length 4.5
  Top Layer w0.3: DD5.14 96.79,47.89 96.8,47.9 ; DD5.15 95.216,48.54 96.476,48.54 96.513,48.576 ; DD5.16 95.216,49.145 96.655,49.145 96.7,49.1
M2_OUT_-: C60.2 DD5.17 DD5.18 DD5.19 XP9.2 | length 3.9
  Top Layer w0.3: DD5.17 95.206,49.8 96.5,49.8 ; DD5.18 96.5,50.43 ; DD5.19 95.216,51.08 96.48,51.08 96.5,51.1
M3_OUT_+: C39.2 DD4.4 DD4.5 DD4.6 XP10.1 | length 3.8
  Top Layer w0.3: DD4.4 95.416,21.152 96.752,21.152 96.8,21.2 ; DD4.5 95.416,21.787 96.587,21.787 96.6,21.8 ; DD4.6 95.408,22.4 96.6,22.4
M3_OUT_-: C39.1 DD4.7 DD4.8 DD4.9 XP10.2 | length 4.1
  Top Layer w0.3: DD4.7 95.416,23.057 96.657,23.057 96.7,23.1 ; DD4.8 95.416,23.692 96.892,23.692 96.9,23.7 ; DD4.9 95.413,24.3 96.7,24.3
M4_OUT_+: C40.1 DD4.14 DD4.15 DD4.16 XP11.1 | length 4.1
  Top Layer w0.3: DD4.14 95.413,27.5 96.7,27.5 ; DD4.15 95.416,28.137 96.737,28.137 96.8,28.2 ; DD4.16 95.416,28.743 96.657,28.743 96.7,28.7
M4_OUT_-: C40.2 DD4.17 DD4.18 DD4.19 XP11.2 | length 3.8
  Top Layer w0.3: DD4.17 95.406,29.398 96.698,29.398 96.7,29.4 ; DD4.18 95.416,30.013 96.536,30.013 96.551,29.998 ; DD4.19 95.416,30.677 96.677,30.677 96.7,30.7
MCU_DIR_M1: DD2.51 DD3.3 | length 14
  Top Layer w0.3: DD2.51 63.9,44.981 64.1,44.781 v1(64.1,44.7) ; v1(70.719,43.7) 72.646,43.7 74.251,45.305 DD3.3
  Bottom Layer w0.3: v1(64.1,44.7) 64.119,44.7 65.619,43.2 70.019,43.2 70.023,43.204 70.223,43.204 v1(70.719,43.7)
MCU_DIR_M2: DD2.52 DD3.5 | length 15
  Top Layer w0.3: DD2.52 63.4,44.381 63.923,43.857 64.043,43.857 v1(64.1,43.8) ; v1(70.7,41.7) 73.186,41.7 74.251,42.765 DD3.5
  Bottom Layer w0.3: v1(64.1,43.8) 66.2,41.7 v1(70.7,41.7)
MCU_DIR_M3: DD2.53 DD6.3 | length 32.2
  Top Layer w0.3: v1(62.7,44.7) 62.7,44.781 62.9,44.981 DD2.53 ; v1(70.7,27.6) 73.25,25.05 DD6.3
  Bottom Layer w0.3: v1(62.7,44.7) 62.643,44.643 62.643,44.486 62.25,44.093 62.25,33.95 70.65,25.55 71.069,25.55 71.4,25.881 71.4,26.819 70.7,27.519 v1(70.7,27.6)
MCU_DIR_M4: DD2.54 DD6.5 | length 30.7
  Top Layer w0.3: v1(61.8,44.719) 61.8,44.768 62.4,45.368 DD2.54 ; v1(70.8,24.7) 70.881,24.7 73.012,22.569 74.539,22.569 DD6.5
  Bottom Layer w0.3: v1(61.8,44.719) 61.2,44.119 61.2,34.255 70.755,24.7 v1(70.8,24.7)
MCU_FAULT_DRV_1: DD2.81 DD3.6 | length 32.5
  Top Layer w0.3: DD2.81 52.575,41.925 v1(52.6,41.9) ; v1(69,45.7) 69,45.619 69.769,44.85 69.769,41.712 70.481,41 73.673,41 74.168,41.495 DD3.6
  Bottom Layer w0.3: v1(52.6,41.9) 60.224,41.9 60.4,42.076 60.4,45.524 60.576,45.7 v1(69,45.7)
MCU_FAULT_DRV_2: DD2.82 DD6.6 | length 37.4
  Top Layer w0.3: DD2.82 51.494,41.425 51.761,41.157 52.543,41.157 v1(52.6,41.1) ; v1(70.7,23.6) 73.06,21.24 DD6.6
  Bottom Layer w0.3: v1(52.6,41.1) 52.681,41.1 52.831,41.25 52.869,41.25 53.019,41.4 60.324,41.4 60.5,41.224 60.5,34.219 70.15,24.569 70.15,24.431 70.643,23.938 70.643,23.657 v1(70.7,23.6)
MCU_PWM_M1: DD2.31 DD3.2 | length 21.2
  Top Layer w0.3: v1(63.9,34.8) 63.981,34.8 64.106,34.925 DD2.31 ; v1(71.8,44.8) 71.857,44.857 72.45,44.857 74.168,46.575 DD3.2
  Bottom Layer w0.3: v1(63.9,34.8) 63.981,34.8 64.131,34.95 64.169,34.95 65.95,36.731 65.95,38.843 67.657,40.55 71.224,40.55 71.85,41.176 71.85,44.75 v1(71.8,44.8)
MCU_PWM_M2: DD2.32 DD3.4 | length 19.3
  Top Layer w0.3: v1(63.9,35.6) 63.981,35.6 64.156,35.425 DD2.32 ; v1(70.7,42.7) 72.916,42.7 74.251,44.035 DD3.4
  Bottom Layer w0.3: v1(63.9,35.6) 63.981,35.6 64.131,35.75 64.169,35.75 65.45,37.031 65.45,39.05 67.45,41.05 70.969,41.05 71.35,41.431 71.35,41.969 70.7,42.619 v1(70.7,42.7)
MCU_PWM_M3: DD2.35 DD6.2 | length 18.9
  Top Layer w0.3: v1(63.9,36.4) 63.957,36.457 64.375,36.457 64.843,36.925 DD2.35 ; v1(70.7,28.6) 72.921,26.379 74.539,26.379 DD6.2
  Bottom Layer w0.3: v1(63.9,36.4) 63.819,36.4 63.669,36.25 63.631,36.25 63.25,35.869 63.25,34.531 69.181,28.6 v1(70.7,28.6)
MCU_PWM_M4: DD2.36 DD6.4 | length 21.5
  Top Layer w0.3: v1(63.881,37.2) 64.106,37.425 DD2.36 ; v1(70.7,26.5) 73.377,23.823 74.555,23.823 DD6.4
  Bottom Layer w0.3: v1(63.881,37.2) 63.8,37.2 63.65,37.05 63.631,37.05 62.75,36.169 62.75,34.324 68.974,28.1 70.424,26.65 70.469,26.65 70.619,26.5 v1(70.7,26.5)
NetC1_2: C1.2 C2.2 C8.2 C9.2 DD1.10 DD1.15 | length 18.8
  Top Layer w0.3: C2.2 32.007,51.7 32.5,51.206 32.503,51.209 34.929,51.209 DD1.15 35.67,51.225 37.6,53.155 37.6,55.645 35.67,57.575 DD1.10 34.881,57.639 32.564,57.639 C9.2 32.5,57.691 32.01,57.2 C1.2
NetC17_2: C17.2 DD2.22 FB1.2 | length 9.7
  Top Layer w0.3: DD2.22 62.4,31.482 62.693,31.775 63.786,31.775 64.107,31.775 65.5,30.382 C17.2 65.6,27.4 67.3,27.4 FB1.2
NetC21_1: C21.1 DD2.49 | length 6.6
  Top Layer w0.3: DD2.49 66.407,43.925 68.3,42.032 68.3,39 C21.1
NetC22_1: C22.1 DD2.73 | length 4.5
  Top Layer w0.3: DD2.73 52.9,48.2 53.226,48.526 53.226,48.826 54.2,49.8 C22.1
NetC28_2: C28.2 DD2.13 ZQ1.1 | length 5.8
  Top Layer w0.3: DD2.13 57.9,28.523 58.475,27.948 58.475,27.203 ; 58.3,27.053 60.25,27.053 C28.2
NetC31_2: C31.2 DD2.12 ZQ1.2 | length 6.5
  Top Layer w0.3: C31.2 54.5,27.203 56.3,27.203 ZQ1.2 56.45,27.178 56.363,27.266 56.05,27.578 57.4,28.928 DD2.12
NetC43_1: C43.1 DD4.43 | length 3.9
  Top Layer w0.3: C43.1 87.552,17.755 87.863,17.755 88.851,18.743 88.851,19.542 88.541,19.853 87.814,19.853 DD4.43
NetC43_2: C43.2 DD4.44 | length 2.5
  Top Layer w0.3: C43.2 86.215,17.6 86.371,17.755 86.371,17.804 87.36,18.794 87.36,19.218 87.375,19.233 DD4.44
NetC46_1: C46.1 DD5.1 | length 2.8
  Top Layer w0.3: DD5.1 95.738,39.635 96.5,38.873 96.5,38.1 C46.1
NetC51_1: C51.1 DD4.1 | length 2.5
  Top Layer w0.3: DD4.1@95.938,19.233 97.2,17.971 97.2,17.5 C51.1
NetC57_1: C57.1 DD5.43 | length 3.7
  Top Layer w0.3: C57.1 87.412,38 88.651,39.239 88.651,39.945 88.341,40.255 87.614,40.255 DD5.43
NetC57_2: C57.2 DD5.44 | length 2.8
  Top Layer w0.3: C57.2 86.219,38 86.374,38.155 86.374,39.459 86.549,39.635 DD5.44
NetDA3_3: DA3.3 R7.2
NetDD2_94: DD2.94 R6.2 | length 2.4
  Top Layer w0.3: R6.2 48.175,34.825 48.425,35.075 48.425,35.249 48.601,35.425 DD2.94
NetDD4_30: DD4.30 R12.1 | length 2.5
  Top Layer w0.3: R12.1 85.9,28.6 85.725,28.425 86.027,28.123 DD4.30
NetDD4_31: DD4.31 R13.1 | length 2.6
  Top Layer w0.3: R13.1@85.725,26.4 85.725,26.475 86.356,27.106 86.356,27.244 86.585,27.473 87.784,27.473 DD4.31
NetDD4_33: DD4.33 DD4.34 R15.1 R16.2 | length 14.3
  Top Layer w0.3: R15.1 80.875,31.4 81.125,31.15 81.125,30.289 82.54,28.874 82.54,26.99 83.955,25.575 84.65,25.575 R16.2@85.95,24.275 ; R16.2 R16.2@85.95,24.275 ; DD4.33 87.814,26.203 88.449,26.203 88.627,26.024 88.627,25.776 88.449,25.597 87.814,25.597 87.784,25.568 87.058,25.568 86.624,25.134 86.624,24.949 R16.2@85.95,24.275
NetDD4_42: DD4.42 R14.2 | length 2.3
  Top Layer w0.3: R14.2 85.9,19.675 86.15,19.925 86.225,19.925 86.803,20.503 DD4.42
NetDD5_30: DD5.30 R21.1 | length 2.2
  Top Layer w0.3: R21.1 85.875,48.775 86.525,48.775 86.79,48.51 87.733,48.51 DD5.30@87.748,48.525
NetDD5_31: DD5.31 R20.1 | length 2.6
  Top Layer w0.3: R20.1@85.725,46.7 85.95,46.925 85.95,47.125 86.025,47.125 86.775,47.875 87.733,47.875 DD5.31@87.748,47.89
NetDD5_33: DD5.33 DD5.34 R17.1 R18.2 | length 14.7
  Top Layer w0.3: R17.1 81.375,51.75 82.1,51.025 82.1,47.53 83.755,45.875 84.45,45.875 85.7,44.625 85.7,44.5 85.906,44.706 85.906,45.206 86.67,45.97 87.733,45.97 87.763,46 88.465,46 88.646,46.181 88.646,46.43 88.471,46.605 87.763,46.605 DD5.33@87.748,46.62
NetDD5_42: DD5.42 R19.2 | length 2.8
  Top Layer w0.3: R19.2 85.35,40.175 85.6,40.425 85.675,40.425 86.14,40.89 DD5.42@87.733,40.89
NetHL1_2: HL1.2 R8.2
NetHL2_2: HL2.2 R10.2 | length 3.1
  Top Layer w0.3: R10.2 46.705,23.305 48.496,23.305 48.596,23.205 49.335,23.205 49.6,22.94 HL2.2
NetR1_1: R1.1 XP7.2 | length 4.3
  Top Layer w0.3: R1.1 65.975,20.725 65.975,19.825 XP7.2
NetR2_1: R2.1 XP4.2 | length 3.2
  Top Layer w0.3: R2.1 37.945,20.63 37.945,17.655 XP4.2
NetR3_1: R3.1 XP5.2 | length 4.1
  Top Layer w0.3: R3.1 46.175,20.775 46.175,19.725 XP5.2
NetR4_1: R4.1 XP6.2 | length 4.2
  Top Layer w0.3: R4.1 57.4,20.725 56.7,20.025 56.7,19.3 XP6.2
RESET: C7.2 DD2.14 XP3.15 | length 6.4
  Top Layer w0.3: XP3.15 33.28,37.68 C7.2 ; DD2.14 58.4,31.482 v1(58.4,32.5)
RS485_DIR: DD1.4 DD1.5 DD2.67 | length 21.6
  Top Layer w0.3: DD1.4 44.156,53.864 43.036,53.864 42.624,54.276 42.624,54.524 43.036,54.936 44.156,54.936 DD1.5 44.287,55.067 46.967,55.067 v2(46.999,55.099)
  Bottom Layer w0.3: v2(46.999,55.099) v2@57.499,44.6
  other v2: 57.5,44.6
RS_N: DD1.12 DD1.13 R5.2 XP2.1 | length 11.7
  Top Layer w0.3: XP2.1 26.404,54.896 26.404,54.853 26.58,54.677 29.999,54.677 30.175,54.853 30.175,54.875 30.425,55.125 R5.2 30.575,55.125 30.825,54.875 30.825,54.853 31.001,54.677 32.04,54.677 33.31,53.407 33.894,53.407 34.07,53.583 34.07,53.615 34.22,53.765 DD1.13 DD1.12
RS_P: DD1.11 DD1.14 R5.1 XP2.2 | length 16.3
  Top Layer w0.3: XP2.2 25.9,53.533 26.49,54.123 29.999,54.123 30.175,53.947 30.175,53.925 30.425,53.675 R5.1 30.575,53.675 30.825,53.925 30.825,53.947 31.001,54.123 31.811,54.123 33.081,52.853 33.894,52.853 34.07,52.677 34.07,52.645 34.22,52.495 DD1.14 35.67,52.495 36.32,53.145 36.32,55.655 35.67,56.305 DD1.11
UART_RX: DD1.3 DD2.69
UART_TX: DD1.6 DD2.68 | length 24.1
  Top Layer w0.3: DD1.6 44.258,56.302 46.998,56.302 v2(47,56.3) ; DD2.68 55.4,45.368 56.3,44.468 v2(56.3,44.4)
  Bottom Layer w0.3: v2(47,56.3) 56.3,47 56.302,47 58.35,44.952 58.35,44.248 57.852,43.75 57.139,43.75 56.489,44.4 v2(56.3,44.4)
VDD: C12.1 C14.1 C15.2 C16.2 C20.2 C23.2 C24.2 C27.2 C29.2 C30.2 C32.2 C34.2 C38.2 C61.2 D1.2 DD1.2 DD1.7 DD2.6 DD2.11 DD2.19 DD2.28 DD2.50 DD2.75 DD2.100 DD3.1 DD6.1 R9.2 XP3.1 | length 22.4
  Top Layer w0.3: DD1.2 43.53,51.225 42.124,52.631 42.124,56.169 43.53,57.575 DD1.7 ; DD2.50 67.581,44.425 C23.2 ; C23.2@67.619,44.4 67.774,44.555 67.774,45.393 70.226,47.845 DD3.1 75.049,49.46 C38.2@74.709,49.8
VDDA: C13.2 C26.2 C37.2 DA2.1 DA3.5 FB1.1
VREF+: C33.2 C36.2 DA2.2 DD2.21 XP4.1 XP5.1 XP6.1 XP7.1
pads on no net: DA3.4 DD2.1 DD2.2 DD2.3 DD2.4 DD2.5 DD2.9 DD2.15 DD2.16 DD2.17 DD2.18 DD2.30 DD2.33 DD2.34 DD2.37 DD2.38 DD2.39 DD2.40 DD2.41 DD2.42 DD2.43 DD2.44 DD2.45 DD2.46 DD2.47 DD2.48 DD2.55 DD2.56 DD2.57 DD2.58 DD2.59 DD2.60 DD2.61 DD2.62 DD2.63 DD2.64 DD2.65 DD2.66 DD2.70 DD2.71 DD2.78 DD2.79 DD2.80 DD2.83 DD2.84 DD2.85 DD2.86 DD2.87 DD2.88 DD2.91 DD2.92 DD2.93 DD2.95 DD2.96 DD2.97 DD2.98 DD3.7 DD4.32 DD4.36 DD5.32 DD5.36 DD6.7 XP3.2 XP3.11

## Polygon pours and split planes (outlines as drawn)
M3_OUT_- on Top Layer "M3_OUT_-_L01_P020" (solid, pour order 20): 96.6,24.567 99.895,24.567 101.864,22.598 112.726,22.598 112.726,20.873 101.139,20.873 99.27,22.742 96.6,22.742
M2_OUT_- on Top Layer "M2_OUT_-_L01_P015" (solid, pour order 15): 96.5,49.58 98.3,49.58 100.352,51.632 112.549,51.632 112.549,53.432 99.752,53.432 97.6,51.28 96.5,51.28
M1_OUT_- on Top Layer "M1_OUT_-_L01_P021" (solid, pour order 21): 96.419,44.999 99.844,44.999 101.813,43.03 112.675,43.03 112.675,41.305 101.088,41.305 99.219,43.174 96.419,43.174
M1_OUT_+ on Top Layer "M1_OUT_+_L01_P019" (solid, pour order 19): 96.4,43.03 98.887,43.03 102.937,38.98 112.687,38.98 112.687,37.355 102.162,37.355 98.157,41.361 96.4,41.361
M2_OUT_+ on Top Layer "M2_OUT_+_L01_P017" (solid, pour order 17): 96.513,47.742 99.088,47.742 112.649,47.742 112.649,49.411 98.357,49.411 96.513,49.411
M4_OUT_+ on Top Layer "M4_OUT_+_L01_P016" (solid, pour order 16): 96.563,27.309 99.138,27.309 112.7,27.309 112.7,28.978 98.408,28.978 96.563,28.978
M4_OUT_- on Top Layer "M4_OUT_-_L01_P014" (solid, pour order 14): 96.551,29.148 98.351,29.148 100.403,31.2 112.6,31.2 112.6,33 99.803,33 97.651,30.848 96.551,30.848
M3_OUT_+ on Top Layer "M3_OUT_+_L01_P018" (solid, pour order 18): 96.6,22.598 98.938,22.598 102.988,18.548 112.738,18.548 112.738,16.923 102.213,16.923 98.208,20.928 96.6,20.928

## Silkscreen, mask and mechanical layers (free items; w line width, h text height)
Top Overlay:
  drawing of 3 lines, arcs and shapes, not listed
Mechanical 1:
  the board outline again, w0.254